# Altium PCB Portable_Guitar_MultiFX.PcbDoc
Units mil, origin at the board's own origin, x right, y up, seen from the top; angles counter-clockwise.
Board outline 1525 x 3675 mil, 2 copper layers (Top Layer, Bottom Layer), stack 62.249 mil thick; 67 components, 41 nets, 234 pads, 165 vias.
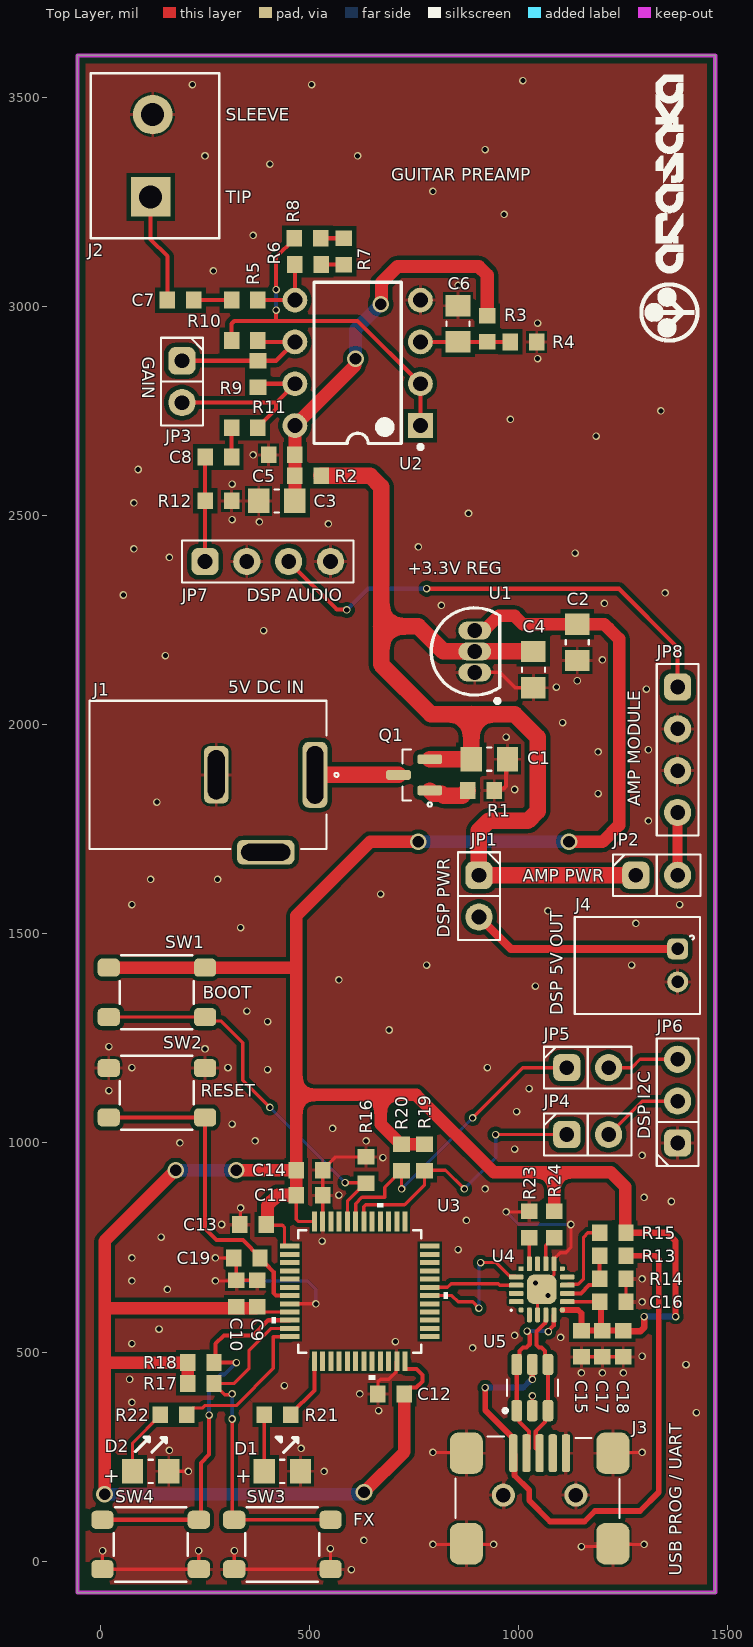
[diagram p0: Top Layer view]
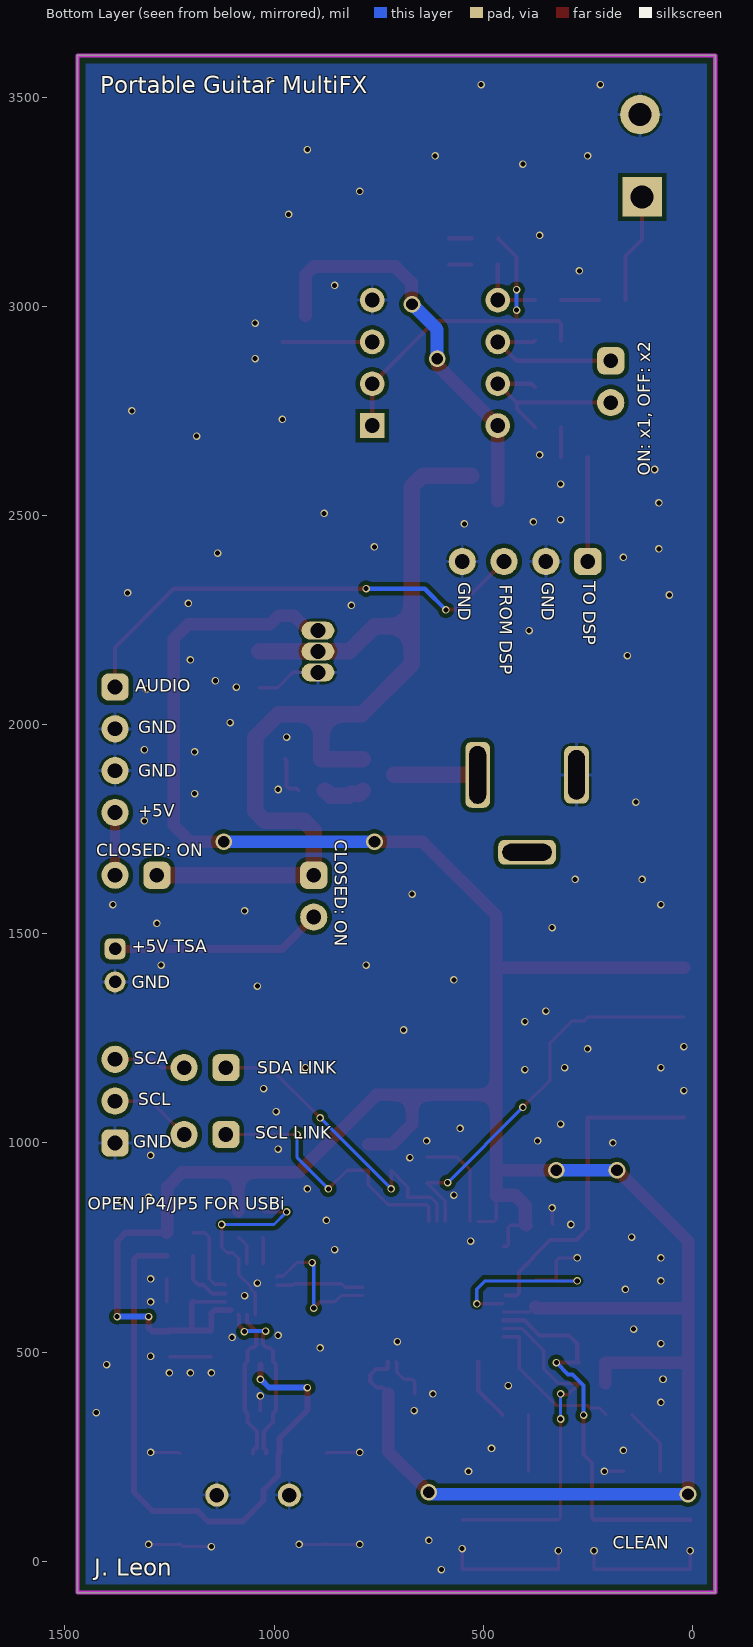
[diagram p1: Bottom Layer view, seen from below]
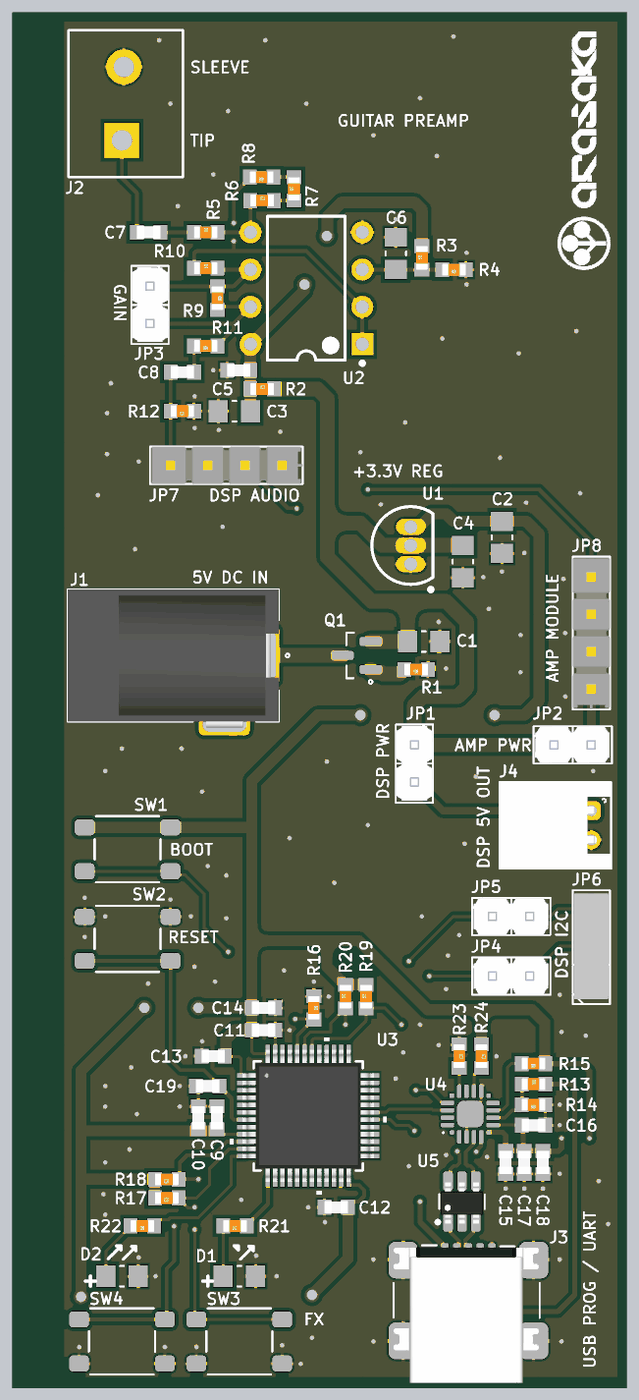
[diagram p2: 3D render of the assembled board from above, using the file's embedded part models]

## Layer stack, top to bottom
Top Solder: solder mask 0.4, Solder Resist, Dk 3.5
Top Layer: signal copper 1.4
Dielectric 1: dielectric 59.4488, FR-4, Dk 4.8
Bottom Layer: signal copper 1.4
Bottom Solder: solder mask 0.4, Solder Resist, Dk 3.5

## Board outline
-55,868.75 -55,3600 1470,3600 1470,-75 -55,-75

## Design rules (kind name [scope] priority, off if disabled: settings)
BoardOutlineClearance [All] p1: gap=20 ignorepadtopadclearanceinfootprint=FALSE
Clearance Clearance_u1 [IsPad And InComponent('U1')] p1: gap=6 ignorepadtopadclearanceinfootprint=FALSE
Clearance Clearance_u4 [IsPad And InComponent('U4')] p2: gap=6 ignorepadtopadclearanceinfootprint=TRUE
Clearance Clearance_u3 [IsPad And InComponent('U3')] p3: gap=6 ignorepadtopadclearanceinfootprint=TRUE
Clearance "Clearence vias" [IsVia] p4 off: gap=8 ignorepadtopadclearanceinfootprint=TRUE
Clearance "Same Differential Pair" [InNet('USB_DP') or InNet('USB_DM') vs InNet('USB_DP') Or InNet('USB_DM')] p5: gap=6 ignorepadtopadclearanceinfootprint=FALSE
Clearance [All] p6: gap=10 ignorepadtopadclearanceinfootprint=TRUE
DiffPairsRouting [All] p1: maxlimit=6 minlimit=6 mostfreqgap=6 toplayer_minwidth=10 toplayer_maxwidth=28 toplayer_prefwidth=28 bottomlayer_minwidth=10 bottomlayer_maxwidth=28 bottomlayer_prefwidth=28 maxuncoupledlength=500
HoleSize HoleSize_J1_Ranuras [IsPad And InComponent('J1')] p1: absolutevalues=TRUE maxlimit=137.8 minlimit=1 maxpercent=80.000 minpercent=20.000
HoleSize [All] p2: absolutevalues=TRUE maxlimit=200 minlimit=12 maxpercent=80.000 minpercent=20.000
HoleToHoleClearance [All] p1: gap=12 allowstackedmicrovias=TRUE
MinimumAnnularRing [All] p1: minimumring=3
MinimumSolderMaskSliver [All] p1: minsoldermaskwidth=3.94
PolygonConnect PolygonConnect_1 [InNet('GND')] p1: thpad.connectstyle=Relief thpad.reliefconductorwidth=8 thpad.reliefentries=4 thpad.polygonreliefangle="90 Angle" thpad.airgapwidth=6 smdpad.connectstyle=Relief smdpad.reliefconductorwidth=8 smdpad.reliefentries=4 smdpad.polygonreliefangle="90 Angle" smdpad.airgapwidth=6 via.connectstyle=Direct via.reliefconductorwidth=10 via.reliefentries=4 via.polygonreliefangle="90 Angle" via.airgapwidth=10
PolygonConnect [All] p2: connectstyle=Relief reliefconductorwidth=10 reliefentries=4 polygonreliefangle="90 Angle" airgapwidth=10
RoutingVias [All] p1: holewidth=12 width=22 viastyle="Through Hole" minholewidth=12 minwidth=18 maxholewidth=30 maxwidth=40
RoutingVias 5V [All] p2: holewidth=28 width=48 viastyle="Through Hole" minholewidth=28 minwidth=48 maxholewidth=28 maxwidth=48
RoutingVias "5V_A Via" [InNet('+5V_A')] p3: holewidth=11.81 width=23.62 viastyle="Through Hole" minholewidth=11.81 minwidth=23.62 maxholewidth=11.81 maxwidth=23.62
SilkToSilkClearance [All] p1: silktosilkclearance=2
SilkToSolderMaskClearance [IsPad] p1: minsilkscreentomaskgap=0.1 clearancetoexposedcopper=TRUE
SolderMaskExpansion SolderMaskExpansion_vias [IsVia] p1: expansion=2 istentingtop=TRUE
SolderMaskExpansion [All] p2: expansion=2 istentingtop=FALSE
SupplyNets "Schematic Supply Nets_6" [InNet('+5V_A')] p1: voltage=0.000
SupplyNets "Schematic Supply Nets_5" [InNet('GND')] p2: voltage=0.000
SupplyNets "Schematic Supply Nets_4" [InNet('VIN_5V_RAW')] p3: voltage=0.000
SupplyNets "Schematic Supply Nets_3" [InNet('+5V_SYS')] p4: voltage=0.000
SupplyNets "Schematic Supply Nets_2" [InNet('+5V_AMP')] p5: voltage=0.000
SupplyNets "Schematic Supply Nets_1" [InNet('+3V3_CTRL')] p6: voltage=0.000
SupplyNets "Schematic Supply Nets" [InNet('+5V_TSA')] p7: voltage=0.000
Width W_CONTROL_Y_ANALOGICA [InNet('+3V3_CTRL') OR InNet('+5V_A')] p1: maxlimit=31.5 minlimit=7.87 preferedwidth=13.78
Width W_5V_TSA [InNet('+5V_TSA')] p2: maxlimit=39.37 minlimit=11.81 preferedwidth=19.68
Width W_5V_ENTRADA [InNet('VIN_5V_RAW') OR InNet('+5V_SYS')] p3: maxlimit=78.74 minlimit=23.62 preferedwidth=39.37
Width W_5V_AMP [InNet('+5V_AMP')] p4: maxlimit=78.74 minlimit=23.62 preferedwidth=39.37
Width W_GENERAL [All] p5: maxlimit=39.37 minlimit=7.87 preferedwidth=9.84
24 further rules are at their usual default settings.

## Classes and differential pairs
component class U_04_Interfaces_Audio: J4 JP6 JP7 JP8
component class U_03_Control: C9 C10 C11 C12 C13 C14 C15 C16 C17 C18 C19 D1 D2 J3 JP4 JP5 R13 R14 R15 R16 R17 R18 R19 R20 R21 R22 R23 R24 SW1 SW2 SW3 SW4 U3 U4 U5
component class U_02_Entrada_Guitarra: C5 C6 C7 C8 J2 JP3 R3 R4 R5 R6 R7 R8 R9 R10 R11 R12 U2
component class U_01_Alimentacion: C1 C2 C3 C4 J1 JP1 JP2 Q1 R1 R2 U1
differential pair USB: +USB_DP -USB_DM

## Components (designator, comment, footprint, x,y, rotation, side; value= is the part's Value field where it differs from the comment)
C1 "10uF 25V" 0805_cap 930,1917.4 r0 top value=10uF
C2 "10uF 25V" 0805_cap 1140,2196.69 r90 top value=10uF
C3 "22uF 16V" 0805_cap 421.69,2535 r180 top value=22uF
C4 "10uF 25V" 0805_cap 1035,2131.69 r90 top value=10uF
C5 "0.1uF 50V" 0603_cap 433.5,2645 r180 top value=0.1uF
C6 "10uF 25V" 0805_cap 855,2958.31 r90 top value=10uF
C7 "470nF 50V" 0603_cap 191.5,3015 r0 top value=470nF
C8 "1uF 50V" 0603_cap 282,2640 r180 top value=1uF
C9 "1uF 50V" 0603_cap 375,640 r90 top value=1uF
C10 "0.1uF 50V" 0603_cap 325,640 r90 top value=0.1uF
C11 "0.1uF 50V" 0603_cap 500,875 r0 top value=0.1uF
C12 "0.1uF 50V" 0603_cap 695,400 r0 top value=0.1uF
C13 "0.1uF 50V" 0603_cap 365,805 r0 top value=0.1uF
C14 "10uF 10V" 0603_cap 500,935 r0 top value=10uF
C15 "10uF 10V" 0603_cap 1150,520 r270 top value=10uF
C16 "0.1uF 50V" 0603_cap 1225,620 r0 top value=0.1uF
C17 "10uF 10V" 0603_cap 1200,520 r270 top value=10uF
C18 "0.1uF 50V" 0603_cap 1250,520 r270 top value=0.1uF
C19 "0.1uF 50V" 0603_cap 350,725 r180 top value=0.1uF
D1 "2V" 0805_LED 435,215 r0 top
D2 "2.9V" 0805_LED 120,215 r0 top
J1 "PWR JACK 2.1mm" CON_POWER_BARREL_2.1MM_3CONN 395,1880 r270 top
J2 "Connector 2pos" CON_2x1_TH_5MM 130,3360 r90 top
J3 "USB Mini B" CON_5x1_SMD_miniUSB_B 1050,150 r0 top
J4 "TSA1701 - 5V A MICRO-US" CON_2x1_TH_2MM 1380,1424.37 r270 top
JP1 "2x1" H_2x1_TH_100mil 905,1590 r270 top
JP2 "2x1" H_2x1_TH_100mil 1330,1640 r0 top
JP3 "2x1" H_2x1_TH_100mil 195,2820 r270 top
JP4 "2x1" H_2x1_TH_100mil 1165,1020 r0 top
JP5 "2x1" H_2x1_TH_100mil 1165,1180 r0 top
JP6 "TSA1701 - CONTROL I2C" H_3X1_TH_100mil 1380,1100 r90 top
JP7 "TSA1701 - AUDIO ADC0/DAC0" H_4x1_TH_2.54mm 400,2390 r0 top
JP8 "PAM8302 - AUDIO Y ALIMENTACION" H_4x1_TH_2.54mm 1380,1940 r270 top
Q1 "P CH" SOT_23_3 750,1880 r180 top
R1 "10k 1/10W" 0603_res 910,1842.6 r180 top value=10k
R2 "100R 1/10W" 0603_res 496.5,2595 r0 top value=100R
R3 "10k 1/10W" 0603_res 925,2946.5 r90 top value=10k
R4 "10k 1/10W" 0603_res 1011.5,2915 r180 top value=10k
R5 "4k7 1/10W" 0603_res 345,3015 r0 top value=4k7
R6 "390k 1/10W" 0603_res 496.5,3100 r0 top value=390k
R7 "390k 1/10W" 0603_res 581.5,3131.5 r90 top value=390k
R8 "226k 1/10W" 0603_res 495,3163 r180 top value=226k
R9 "10k 1/10W" 0603_res 376.5,2838.5 r270 top value=10k
R10 "10k 1/10W" 0603_res 345,2918.5 r0 top value=10k
R11 "100R 1/10W" 0603_res 345,2710 r180 top value=100R
R12 "226k 1/10W" 0603_res 282,2535 r180 top value=226k
R13 "33k2 1/10W" 0603_res 1225,730 r0 top value=33k2
R14 "73k2 1/10W" 0603_res 1225,675 r180 top value=73k2
R15 "1k 1/10W" 0603_res 1225,785 r180 top value=1k
R16 "10k 1/10W" 0603_res 635,935 r270 top value=10k
R17 "10k 1/10W" 0603_res 240,425 r180 top value=10k
R18 "10k 1/10W" 0603_res 240,475 r180 top value=10k
R19 "4k7 1/10W" 0603_res 775,965 r90 top value=4k7
R20 "4k7 1/10W" 0603_res 720,965 r90 top value=4k7
R21 "1k 1/10W" 0603_res 423.19,350 r180 top value=1k
R22 "1k 1/10W" 0603_res 175,350 r180 top value=1k
R23 "10k 1/10W" 0603_res 1025,805 r270 top value=10k
R24 "10k 1/10W" 0603_res 1085,805 r270 top value=10k
SW1 "Sw" Sw_PUSH_4.5x4.5x5mm 135,1360 r0 top
SW2 "Sw" Sw_PUSH_4.5x4.5x5mm 135,1120 r0 top
SW3 "Sw" Sw_PUSH_4.5x4.5x5mm 435,40 r0 top
SW4 "Sw" Sw_PUSH_4.5x4.5x5mm 120,40 r0 top
U1 "MCP1700-3302E/TO" TO-92-TO3 895,2175 r0 top
U2 "MCP6002-I/P" PDIP300-P8 615,2865 r180 top
U3 "STM32F030C8T6TR" LQFP48_7x7mm 620,645 r0 top
U4 "CP2102N-A02-GQFN20R" WFQFN_20_EP_3X3MM 1055,650 r90 top
U5 "USBLC6-2SC6" SOT_23_6 1032.6,415.12 r90 top

## Footprints (in the part's own frame and the unit in brackets; to place one, negate y for a bottom-side part, rotate by r counter-clockwise, add the part's x,y. Pads: shape width x height; smd on the part's side, far side on the other; paste and mask are expansions set on the pad)
0603_cap [mil]
  rect 37x40 smd: 1(-31.5,0) 2(31.5,0)
  body extent -31,-17 31,17, height 34
0603_res [mil] "1608 Metric / 20190225 / C-A.Serna.A"
  rect 37x40 smd: 1(-31.5,0) 2(31.5,0)
  body extent -31,-16 32,16, height 12
0805_cap [mm]
  rect 1.3x1.5 smd: 1(-1.1,0) 2(1.1,0)
  silkscreen extent -0.13,-0.7 0.13,0.7, body extent -1.13,-0.7 1.07,0.7, height 1
0805_LED [mm]
  rect 1.3x1.5 smd: 1(-1.1,0) 2(1.1,0)
  silkscreen extent -0.36,-0.7 0.95,2.07, body extent -1,-0.62 1,0.63, height 1.1
CON_2x1_TH_2MM [mil] "/20190307/N-A.Potosi"
  rrect50% 50x50 hole 30: 1(-39.37,0)
  round 50 hole 30: 2(39.37,0)
  silkscreen extent -116,-246 116,53, body extent -117,-247 116,52, height 189
CON_2x1_TH_5MM [mm]
  rect 2.4x2.4 hole 1.4: 1(-2.5,0.254)
  round 2.4 hole 1.4: 2(2.5,0.127)
  silkscreen extent -5,-3.9 5,3.9, body extent -5,-3.9 5,3.9, height 10.2
CON_5x1_SMD_miniUSB_B [mm]
  rrect50% 2x2.5 smd: 0(-4.45,-2.75) 0(-4.45,2.75) 0(4.45,-2.75) 0(4.45,2.75)
  round 1.4 hole 0.889: 0(-2.2,0.2) 0(2.2,0.2)
  rrect50% 0.5x2.3 smd: 1(-1.6,2.75) 2(-0.8,2.75) 3(0,2.75) 4(0.8,2.75) 5(1.6,2.75)
  silkscreen extent -5.11,-1.18 4.85,3.76, body extent -5.1,-5.6 4.8,3.65, height 4
CON_POWER_BARREL_2.1MM_3CONN [mm]
  rrect50% 4x1.5 hole 1.016 slot 3.5 at 0 deg: 1(0,3)
  rrect50% 3.5x1.5 hole 1.016 slot 3 at 0 deg: 2(0,-3)
  rrect50% 1.5x3.5 hole 1.016 slot 3 at 90 deg: 3(4.7,0)
  silkscreen extent -4.5,-10.7 4.5,4.43, body extent -4.5,-10.7 4.9,3.7, height 11
H_2x1_TH_100mil [mil]
  rrect50% 65x65 hole 35: 1(-50,0)
  round 65 hole 35: 2(50,0)
  silkscreen extent -105,-50 105,50, body extent -101,-49 99,49, height 339
H_3X1_TH_100mil [mil]
  rrect50% 65x65 hole 35: 1(-100,0)
  round 65 hole 35: 2(0,0) 3(100,0)
  silkscreen extent -155,-50 150,50, body extent -142,-46 142,46, height 320
H_4x1_TH_2.54mm [mil]
  rrect50% 65x65 hole 35: 1(-150,0)
  round 65 hole 35: 2(-50,0) 3(50,0) 4(150,0)
  silkscreen extent -205,-50 205,50, body extent -200,-50 205,50, height 420
LQFP48_7x7mm [mil]
  rect 47x12 smd paste+0 mask+1.8: 1(-167.32,108.27) 2(-167.32,88.58) 3(-167.32,68.9) 4(-167.32,49.21) 5(-167.32,29.53) 6(-167.32,9.84) 7(-167.32,-9.84) 8(-167.32,-29.53) 9(-167.32,-49.21) 10(-167.32,-68.9) 11(-167.32,-88.58) 12(-167.32,-108.27) 25(167.32,-108.27) 26(167.32,-88.58) 27(167.32,-68.9) 28(167.32,-49.21) 29(167.32,-29.53) 30(167.32,-9.84) 31(167.32,9.84) 32(167.32,29.53) 33(167.32,49.21) 34(167.32,68.9) 35(167.32,88.58) 36(167.32,108.27)
  rect 12x47 smd paste+0 mask+1.8: 13(-108.27,-167.32) 14(-88.58,-167.32) 15(-68.9,-167.32) 16(-49.21,-167.32) 17(-29.53,-167.32) 18(-9.84,-167.32) 19(9.84,-167.32) 20(29.53,-167.32) 21(49.21,-167.32) 22(68.9,-167.32) 23(88.58,-167.32) 24(108.27,-167.32) 37(108.27,167.32) 38(88.58,167.32) 39(68.9,167.32) 40(49.21,167.32) 41(29.53,167.32) 42(9.84,167.32) 43(-9.84,167.32) 44(-29.53,167.32) 45(-49.21,167.32) 46(-68.9,167.32) 47(-88.58,167.32) 48(-108.27,167.32)
  silkscreen extent -211,-211 211,211, body extent -177,-177 177,177, height 63
PDIP300-P8 [mm] "8-Pin Plastic Dual In-Line Package (PDIP)"
  rect 1.5x1.5 hole 0.9: 1(-3.81,3.81)
  round 1.5 hole 0.9: 2(-3.81,1.27) 3(-3.81,-1.27) 4(-3.81,-3.81) 5(3.81,-3.81) 6(3.81,-1.27) 7(3.81,1.27) 8(3.81,3.81)
  silkscreen extent -3.94,-4.9 2.65,5.23, body extent -3.55,-4.9 3.55,4.9, height 4.32
SOT_23_3 [mm]
  rrect50% 1.5x0.6 smd: 1(-0.95,0.95) 2(-0.95,-0.95) 3(0.95,0)
  silkscreen extent -1.07,-1.55 0.7,1.92, body extent -0.7,-1.52 0.7,1.53, height 1.12
SOT_23_6 [mm]
  rrect50% 1.3x0.65 smd: 1(-1.4,0.95) 2(-1.4,0) 3(-1.4,-0.95) 4(1.4,-0.95) 5(1.4,0) 6(1.4,0.95)
  silkscreen extent -1.52,-1.55 0.5,1.78, body extent -1.5,-1.45 1.3,1.45, height 1.45
Sw_PUSH_4.5x4.5x5mm [mm]
  rrect50% 1.35x1.1 smd: 1(-2.925,1.5) 1(2.925,1.5) 2(-2.925,-1.5) 2(2.925,-1.5)
  silkscreen extent -2.25,-2.25 2.25,2.25, body extent -2.25,-2.25 2.25,2.25, height 5
TO-92-TO3 [mm] "TO, Flat Index; 3 In-Line, Axial Leads; Body Dia. 4.8mm; Leads 0.56 x 0.53 mm (max)"
  oval 2x1.1 hole 0.9: 1(0,-1.27)
  oval 2x1.103 hole 0.9: 2(0,0) 3(0,1.27)
  silkscreen extent -2.65,-3.13 1.52,2.65, body extent -2.65,-2.66 1.52,2.66, height 5.33
WFQFN_20_EP_3X3MM [mm]
  rrect50% 0.3x0.3 smd: 1(-1.25,1.25) 6(-1.25,-1.25) 11(1.25,-1.25)
  rrect50% 0.9x0.3 smd: 2(-1.55,0.75) 3(-1.55,0.25) 4(-1.55,-0.25) 5(-1.55,-0.75) 12(1.55,-0.75) 13(1.55,-0.25) 14(1.55,0.25) 15(1.55,0.75)
  rrect50% 0.3x0.9 smd: 7(-0.75,-1.55) 8(-0.25,-1.55) 9(0.25,-1.55) 10(0.75,-1.55) 17(0.75,1.55) 18(0.25,1.55) 19(-0.25,1.55) 20(-0.75,1.55)
  rect 0.3x0.3 smd: 16(1.25,1.25)
  rrect50% 1.8x1.8 smd: 21(0,0)
  silkscreen extent -1.32,1.8 -1.22,1.9, body extent -1.5,-1.5 1.5,1.5, height 0.8

## Part data
C1 C2 C4 C6: library part Cap_10uF_0805_25V_, "25V 10uF X5R ±10% 0805 Multilayer Ceramic Capacitors MLCC - SMD/SMT ROHS", Manufacturer="Samsung Electro-Mechanics", Manufacturer Part Number=CL21A106KAYNNNE, Supplier Part Number 1=C15850, ComponentLink1Description=LCSC, ComponentLink1URL=https://lcsc.com/product-detail/Multilayer-Ceramic-Capacitors-MLCC-SMD-SMT_Samsung-Electro-Mechanics-CL21A106KAYNNNE_C15850.html, Supplier 1=LCSC
C3: library part Cap_22uF_0805_16V, "16V 22uF X5R ±20% 0805 Multilayer Ceramic Capacitors MLCC - SMD/SMT ROHS", Manufacturer=Chinocera, Manufacturer Part Number=HGC0805R5226M160NSLJ, Supplier Part Number 1=C33546008, ComponentLink1Description=LCSC, ComponentLink1URL=https://lcsc.com/product-detail/Multilayer-Ceramic-Capacitors-MLCC-SMD-SMT_Chinocera-HGC0805R5226M160NSLJ_C33546008.html, Supplier 1=LCSC
C5 C10 C11 C12 C13 C16 C18 C19: library part Cap_0.1uF_0603_50V, "50V 100nF Y5V -20%~+80% 0603 Multilayer Ceramic Capacitors MLCC - SMD/SMT ROHS", Manufacturer="Walsin Tech Corp", Manufacturer Part Number=0603F104Z500CT, Supplier Part Number 1=C83060, ComponentLink1Description=LCSC, ComponentLink1URL=https://www.lcsc.com/product-detail/Multilayer-Ceramic-Capacitors-MLCC-SMD-SMT_Walsin-Tech-Corp-0603F104Z500CT_C83060.html, Supplier 1=LCSC
C7: library part Cap_470nF_0603_50V, "50V 470nF X7R ±10% 0603 Multilayer Ceramic Capacitors MLCC - SMD/SMT ROHS", Manufacturer=Chinocera, Manufacturer Part Number=HGC0603R7474K500NTHJ, Supplier Part Number 1=C33546006, ComponentLink1Description=LCSC, ComponentLink1URL=https://lcsc.com/product-detail/Multilayer-Ceramic-Capacitors-MLCC-SMD-SMT_Chinocera-HGC0603R7474K500NTHJ_C33546006.html, Supplier 1=LCSC
C8 C9: library part Cap_1uF_0603_50V, "50V 1uF X5R ±10% 0603 Multilayer Ceramic Capacitors MLCC - SMD/SMT ROHS", Manufacturer="Samsung Electro-Mechanics", Manufacturer Part Number=CL10A105KB8NNNC, Supplier Part Number 1=C15849, ComponentLink1Description=LCSC, ComponentLink1URL=https://www.lcsc.com/product-detail/Multilayer-Ceramic-Capacitors-MLCC-SMD-SMT_Samsung-Electro-Mechanics-CL10A105KB8NNNC_C15849.html, Supplier 1=LCSC
C14 C15 C17: library part Cap_10uF_0603_10V, "10V 10uF X5R ±10% 0603 Multilayer Ceramic Capacitors MLCC - SMD/SMT ROHS", Manufacturer=CCTC, Manufacturer Part Number=TCC0603X5R106K100CT, Supplier Part Number 1=C380314, ComponentLink1Description=LCSC, ComponentLink1URL=https://www.lcsc.com/product-detail/Multilayer-Ceramic-Capacitors-MLCC-SMD-SMT_CCTC-TCC0603X5R106K100CT_C380314.html, Supplier 1=LCSC
D1: library part LED_0805_RED, "LED RED CLEAR 0805 SMD", Manufacturer=XINGLIGHT, Manufacturer Part Number=XL-2012SURC, Supplier Part Number 1=C965812, ComponentLink1Description=LCSC, ComponentLink1URL=https://www.lcsc.com/product-detail/Light-Emitting-Diodes-LED_XINGLIGHT-XL-2012SURC_C965812.html, Supplier 1=LCSC
D2: library part LED_0805_Green, "LED GREEN CLEAR 0805 SMD", Manufacturer=XINGLIGHT, Manufacturer Part Number=XL-2012UGC, Supplier Part Number 1=C965815, ComponentLink1Description=LCSC, ComponentLink1URL=https://www.lcsc.com/product-detail/Light-Emitting-Diodes-LED_XINGLIGHT-XL-2012UGC_C965815.html, Supplier 1=LCSC
J1: library part Con_Power_Jack_2.1mm_3pins, "CONN PWR JACK 2X5.5MM SOLDER", Manufacturer=HCTL, Manufacturer Part Number=HC-DC-005-2.0T, Supplier Part Number 1=C3010533, ComponentLink1Description=LCSC, ComponentLink1URL=https://www.lcsc.com/product-detail/AC-DC-Power-Connectors_HCTL-HC-DC-005-2-0T_C3010533.html, Supplier 1=LCSC
J2: library part Con_2x1_TH_5mm, "2POS 5MM", Manufacturer=JILN, Manufacturer Part Number=JL126-50002G01, Supplier Part Number 1=C394556, ComponentLink1Description=Digi-Key, ComponentLink1URL=https://www.lcsc.com/product-detail/Screw-terminal_JILN-JL126-50002G01_C394556.html, Supplier 1=LCSC
J3: library part Con_Mini_USB_B, "CONN RCPT USB2.0 MINI B SMD R/A", Manufacturer="EDAC Inc.", Manufacturer Part Number=KH-MINI-SMT-5P-Cu, Supplier Part Number 1=C2688795, ComponentLink1Description=LCSC, ComponentLink1URL=https://datasheet.lcsc.com/lcsc/2106070035_Shenzhen-Kinghelm-Elec-KH-MINI-SMT-5P-Cu_C2688795.pdf, Supplier 1=LCSC
J4: library part Con_2x1_TH_JST_2MM, "2POS 2MM", Manufacturer=JST, Manufacturer Part Number=S2B-PH-K-S(LF)(SN), Supplier Part Number 1=C173752, ComponentLink1Description=Digi-Key, ComponentLink1URL=https://lcsc.com/product-detail/Wire-To-Board-Connector_JST-S2B-PH-K-S-LF-SN_C173752.html, Supplier 1=LCSC
JP1 JP2 JP3 JP4 JP5: library part H_Male_2x1_TH_100mil, "H_Male_2x1_TH_100mil", ComponentLink1Description=LCSC
JP6: library part H_Male_3x1_TH_100mil, "H_Male_3x1_TH_100mil", ComponentLink1Description=LCSC
JP7 JP8: library part H_Male_4x1_TH_100mil, "H_Male_4x1_TH_100mil", ComponentLink1Description=LCSC
Q1: library part Q_PFET_30V_3A_SOT23, "MOSFET P-CH 20V 3A SOT23", Manufacturer="ALLPOWER(ShenZhen Quan Li Semiconductor)", Manufacturer Part Number=AP2301, Supplier Part Number 1=C385296, ComponentLink1Description=LCSC, ComponentLink1URL=https://www.lcsc.com/product-detail/MOSFETs_ALLPOWER-ShenZhen-Quan-Li-Semiconductor-AP2301_C385296.html, Supplier 1=LCSC
R1 R3 R4 R9 R10 R16 R17 R18 R23 R24: library part Res_10k_0603_1/10W, "RES SMD 10k OHM 5% 1/10W 0603", Manufacturer=FOJAN, Manufacturer Part Number=FRC0603J103TS, Supplier Part Number 1=C2930027, ComponentLink1Description=LCSC, ComponentLink1URL=https://www.lcsc.com/product-detail/Chip-Resistor-Surface-Mount_FOJAN-FRC0603J103TS_C2930027.html, Supplier 1=LCSC
R2 R11: library part Res_100R_0603_1/10W, "RES SMD 100R OHM 5% 1/10W 0603", Manufacturer=FOJAN, Manufacturer Part Number="FRC0603J101 TS", Supplier Part Number 1=C2907089, ComponentLink1Description=LCSC, ComponentLink1URL=https://www.lcsc.com/product-detail/Chip-Resistor-Surface-Mount_FOJAN-FRC0603J101-TS_C2907089.html, Supplier 1=LCSC
R5 R19 R20: library part Res_4k7_0603_1/10W, "100mW Thick Film Resistor 75V ±1% 4.7kΩ 0603 Chip Resistor - Surface Mount ROHS", Manufacturer=VO, Manufacturer Part Number=SCR0603F4K7, Supplier Part Number 1=C3016318, ComponentLink1Description=LCSC, ComponentLink1URL=https://lcsc.com/product-detail/Chip-Resistor-Surface-Mount_VO-SCR0603F4K7_C3016318.html, Supplier 1=LCSC
R6 R7: library part Res_390k_0603_1/10W, "100mW Thick Film Resistor 75V ±100ppm/℃ ±1% 390kΩ 0603 Chip Resistor - Surface Mount ROHS", Manufacturer=YAGEO, Manufacturer Part Number=RC0603FR-07390KL, Supplier Part Number 1=C137735, ComponentLink1Description=LCSC, ComponentLink1URL=https://lcsc.com/product-detail/Chip-Resistor-Surface-Mount_YAGEO-RC0603FR-07390KL_C137735.html, Supplier 1=LCSC
R8 R12: library part Res_226k_0603_1/10W, "100mW Thick Film Resistors 75V ±100ppm/℃ ±1% 226kΩ 0603 Chip Resistor - Surface Mount ROHS", Manufacturer=YAGEO, Manufacturer Part Number=RC0603FR-07226KL, Supplier Part Number 1=C165744, ComponentLink1Description=LCSC, ComponentLink1URL=https://lcsc.com/product-detail/Chip-Resistor-Surface-Mount_YAGEO-RC0603FR-07226KL_C165744.html, Supplier 1=LCSC
R13: library part Res_33k2_0603_1/10W, "100mW Thick Film Resistor 75V ±100ppm/℃ ±1% 33.2kΩ 0603 Chip Resistor - Surface Mount ROHS", Manufacturer=YAGEO, Manufacturer Part Number=RC0603FR-0733K2L, Supplier Part Number 1=C185338, ComponentLink1Description=LCSC, ComponentLink1URL=https://lcsc.com/product-detail/Chip-Resistor-Surface-Mount_YAGEO-RC0603FR-0733K2L_C185338.html, Supplier 1=LCSC
R14: library part Res_73k2_0603_1/10W, "100mW Thick Film Resistor 75V ±100ppm/℃ ±1% 73.2kΩ 0603 Chip Resistor - Surface Mount ROHS", Manufacturer=YAGEO, Manufacturer Part Number=RC0603FR-0773K2L, Supplier Part Number 1=C163420, ComponentLink1Description=LCSC, ComponentLink1URL=https://lcsc.com/product-detail/Chip-Resistor-Surface-Mount_YAGEO-RC0603FR-0773K2L_C163420.html, Supplier 1=LCSC
R15 R21 R22: library part Res_1k_0603_1/10W, "RES SMD 1k OHM 5% 1/10W 0603", Manufacturer=FOJAN, Manufacturer Part Number="FRC0603J102 TS", Supplier Part Number 1=C2907113, ComponentLink1Description=LCSC, ComponentLink1URL=https://www.lcsc.com/product-detail/Chip-Resistor-Surface-Mount_FOJAN-FRC0603J102-TS_C2907113.html, Supplier 1=LCSC
SW1 SW2 SW3 SW4: library part Sw_PUSH_4.5x4.5x5.0xmm, "SWITCH TACTILE SPST-NO 0.05A 12V", Manufacturer=BZCN, Manufacturer Part Number=TSC015A05026A, Supplier Part Number 1=C2888509, ComponentLink1Description=LCSC, ComponentLink1URL=https://www.lcsc.com/product-detail/Tactile-Switches_BZCN-TSC015A05026A_C2888509.html, Last modified by=N-A.Potosi, Last modified date=20190222, Supplier 1=LCSC
U1: library part CMP-0136-00007-1, "Low Quiescent Current LDO, 3-Pin TO-92, Extended TemperatureBAG", DatasheetVersion="revB, Feb-2007", PackageDescription="3-Lead Plastic Transistor Outline (TO) [TO-92]", PackageReference=TO-92-TO3, PackageVersion="revBB, Aug-2009"
U2: library part CMP-0187-00119-3, "None", Case/Package=PDIP, Input Bias Current=1pA, Input Offset Voltage (Vos)=4.5mV, Max Frequency=1kHz, Max Input Voltage=6V, Max Operating Temperature=85°C, Min Input Voltage=1.8V, Min Operating Temperature=-40°C, Nominal Supply Current=100uA, Operating Supply Voltage=5.5V, Output Current=23mA, Package Quantity=60, Power Supply Rejection Ratio (PSRR)=86dB, Voltage Gain=112dB, Amplifier Type="GENERAL PURPOSE", Bandwidth=1MHz, Common Mode Rejection Ratio=60dB, Gain Bandwidth Product=1MHz, Height=0.195inch, Input Offset Voltage-Max=4.5mV, Lead Free="Lead Free", Length=0.4inch, Max Supply Voltage=6V, Min Supply Voltage=1.8V, Mount="Through Hole", Number of Amplifiers=2, Number of Channels=2, Number of Circuits=2, Number of Elements=2, Number of Pins=8, Operating Supply Current=100uA, Output Current per Channel=23mA, Packaging=Rail/Tube, Radiation Hardening=No, REACH SVHC="No SVHC", RoHS Compliant=Yes, Slew Rate=0.6V/µs, Slew Rate-Nom=0.6V/µs, Supply Current=100uA, Technology=CMOS, Unity Gain Bandwidth Product=1MHz, Width=0.28inch
U3: library part IC_STM32F030C8T6TR_LQFP48_7x7MM, "IC MCU 32BIT 64KB FLASH 48LQFP", Manufacturer=STMicroelectronics, Supplier Part Number 1=C23922, ComponentLink1Description=LCSC, ComponentLink1URL=https://www.lcsc.com/product-detail/ST-Microelectronics_STMicroelectronics-STM32F030C8T6_C23922.html, Manufacturer Part Number=STM32F030C8T6TR, Supplier 1=LCSC
U4: library part IC_SGL_USB2UART-BRIDGE_20QFN, "IC USB TO UART BRIDGE QFN20", Manufacturer="Silicon Labs", Supplier Part Number 1=C969913, ComponentLink1Description=LCSC, ComponentLink1URL=https://www.lcsc.com/product-detail/USB-ICs_SILICON-LABS-CP2102N-A02-GQFN20R_C969913.html, Manufacturer Part Number=CP2102N-A02-GQFN20R, Supplier 1=LCSC
U5: library part TVS_5.25V_2CH_SOT_23_6, "TVS DIODE 5.25V 17V SOT23-6", Manufacturer=STMicroelectronics, Supplier Part Number 1=C7519, ComponentLink1Description=LCSC, ComponentLink1URL=https://www.lcsc.com/product-detail/ESD-Protection-Devices_STMicroelectronics-USBLC6-2SC6_C7519.html, Manufacturer Part Number=USBLC6-2SC6, Supplier 1=LCSC

## Via types
v1: diameter 18, hole 12, Top Layer to Bottom Layer, tented both sides, 157 vias
v2: diameter 40, hole 28, Top Layer to Bottom Layer, tented both sides, 8 vias

## Nets (pads, with @x,y where several pads share a name; then routed paths per layer and width w, separated by ;. In a path a pad name is that pad's centre, name@x,y a point inside that pad or via, vN(x,y) a via of type N, cw(c..) or ccw(c..) an arc to the next point about the centre after c; other vN are vias at no path point)
+3V3_CTRL: C2.2 C9.1 C10.1 C11.1 C12.2 C13.2 C14.1 C15.1 C16.1 C17.1 C18.1 R15.1 R17.2 R18.2 R19.2 R20.2 R24.1 SW1.1 U1.3 U3.1 U3.9 U3.24 U3.48 U4.6 U4.7 | length 8083.2
  Top Layer w7.87: C9.1 387.71,595.79 U3.9 ; C13.2@396.5,803.5 435.39,803.5 440,798.89 440,755.33 442.06,753.27 U3.1 ; C11.1 468.5,816.94 473.11,812.32 U3.48 ; U4.7 1116.18,620.32 1193.18,620.32 C16.1
  Top Layer w10: C12.2 726.5,401.5 740,415 755,415 770,430 770,445 755.82,459.18 729.27,459.18 728.27,460.18 U3.24
  Top Layer w13.78: U4.6 1141.93,600.79 1150,592.72 C15.1 C17.1 ; C16.1 1196.75,616.75 1196.75,554.75 C17.1 ; C18.1 C17.1
  Top Layer w15: C18.1 1251.5,550 1291.21,550 1300,558.79 v1(1300,585) ; R15.1 1355,785 1375,765 v1(1375,585)
  Top Layer w30: v2(10,160) 10,475 ; SW1.1@19.84,1419.06 250.16,1419.06 468.5,1419.06 ; v2(180,935) 10,765 10,605 ; R17.2 R18.2 10,475 ; v2(325,935) C14.1 ; C9.1 371.5,605 10,605 ; C11.1@468.5,875.28 C14.1 ; v2(630,165) 726.5,261.5 C12.2 ; v2(760,1720) 645,1720 468.5,1543.5 468.5,1419.06 ; R19.2 R20.2 718.5,996.5 670,1045 670,1115 ; U1.3 917.22,2225 952.22,2260 990,2260 1010,2240 C2.2 1205,2240 1214.99,2230.01 1240,2205 1240,1760 1200,1720 v2(1120.13,1720) ; R24.1 1085,930 ; R15.1 1255,786.5 1255,895 1220,930 1085,930 ; 10,475 10,605 ; C14.1 468.5,1115 ; 468.5,1115 468.5,1419.06 ; 468.5,1115 670,1115 ; 670,1115 755,1115 940,930 1085,930
  Top Layer w31.5: C13.2@396.5,803.5 399.25,806.25 399.25,850.8 423.45,875 C11.1
  Bottom Layer w15: v1(1300,585) v1(1375,585)
  Bottom Layer w30: v2(10,160) 622.29,160 627.29,165 v2(630,165) ; v2(180,935) v2(325,935) ; v2(760,1720) v2(1120.13,1720)
+5V_A: C3.1 C5.1 R2.1 R3.2 U2.8 | length 981.8
  Top Layer w31.5: C3.1 R2.1 C5.1 U2.8 608.37,2858.37 608.37,2873.37 v2(610,2875) ; v2(670,3005) 671.63,3006.63 671.63,3056.63 710,3095 905,3095 925,3075 R3.2
  Bottom Layer w31.5: v2(610,2875) 610,2945 v2(670,3005)
+5V_AMP: JP2.2 JP8.4 | length 150
  Top Layer w23.62: JP2.2 JP8.4
+5V_SYS: C1.1 C4.2 JP1.1 JP2.1 Q1.2 R2.2 U1.2 | length 2438.8
  Top Layer w39.37: R2.2 645,2595 671.06,2568.94 671.06,2235 ; Q1.2 C1.1 886.69,2025 ; U1.2 820,2175 760,2235 671.06,2235 ; U1.2@895,2175.63 1034.37,2175.63 C4.2 ; JP2.1 JP1.1 905,1746.94 928.06,1770 1021.94,1770 1045,1793.06 1045,1970 990,2025 886.69,2025 ; 671.06,2235 671.06,2143.94 790,2025 886.69,2025
+5V_TSA: J4.1 JP1.2 | length 506.6
  Top Layer w19.68: JP1.2 981.26,1463.74 J4.1
BOOT: R16.2 SW1.2 U3.44 | length 943
  Top Layer w7.87: SW1.2@19.84,1300.94 250.16,1300.94 259.65,1291.46 288.54,1291.46 340,1240 340,1150 v1(405,1085) ; v1(585,905) 633.5,905 R16.2 633.5,903.5 590.47,860.47 U3.44
  Bottom Layer w7.87: v1(405,1085) v1(585,905)
BTN_CLEAN: R18.1 SW4.1 U3.10 | length 950.2
  Top Layer w9.84: SW4.1@4.84,99.06 235.16,99.06 240,103.9 240,235 260,255 v1(260,349.13) ; v1(325,475) 275,475 R18.1 275,478.5 275,520 295,540 365,540 401.1,576.1 U3.10
  Bottom Layer w9.84: v1(260,349.13) 260,420 286.72,446.72 296.72,446.72 v1(325,475)
BTN_FX: R17.1 SW3.1 U3.11 | length 850.8
  Top Layer w7.87: v1(315,340) 315,103.9 319.84,99.06 SW3.1@550.16,99.06 ; v1(315,400) 312.26,400 310.06,397.8 297.2,397.8 271.5,423.5 R17.1 320,425 355,460 355,503.33 408.09,556.42 U3.11
  Bottom Layer w7.87: v1(315,340) v1(315,400)
DSP_LINE_OUT: JP7.3 JP8.1 | length 1152
  Top Layer w9.84: JP7.3 565.13,2274.87 588.26,2274.87 v1(588.89,2274.24) ; v1(780,2325) 1240,2325 1380,2185 JP8.1
  Bottom Layer w9.84: v1(588.89,2274.24) 639.66,2325 v1(780,2325)
GND: C1.2 C2.1 C3.2 C4.1 C5.2 C6.2 C9.2 C10.2 C11.2 C12.1 C13.1 C14.2 C15.2 C16.2 C17.2 C18.2 C19.2 D1.2 D2.2 J1.2 J2.2 J3.0 J3.5 J4.2 JP6.1 JP7.2 JP7.4 JP8.2 JP8.3 R1.1 R4.1 R12.1 R14.1 R16.1 R23.1 SW2.1 SW3.2 SW4.2 U1.1 U2.4 U3.8 U3.23 U3.47 U4.3 U4.12 U4.21 U5.2 | length 2998.5
  Top Layer w7.87: v1(5,25) 5,-18.9 4.84,-19.06 235.16,-19.06 235,-18.9 v1(235,25) ; D2.2 v1(210,215) ; v1(275,670) 323.5,670 C10.2 ; v1(275,725) C19.2 325,718.5 C10.2 ; v1(320,25) 320,-18.9 319.84,-19.06 550.16,-19.06 550,-18.9 v1(550,30) ; C13.1 335,806.5 v1(335,845) ; C9.2 C10.2 ; U3.8 452.91,615.24 514.76,615.24 v1(515,615) ; U3.47 531.42,934.92 C14.2 531.5,936.5 546.06,951.06 547.56,951.06 563,966.5 R16.1 ; C12.1 663.5,428.5 670,435 689.77,435 706.52,451.75 706.52,475.61 U3.23 ; v1(795,40) 873.07,40 874.8,41.73 876.54,40 v1(940,40) ; v1(795,260) 873.07,260 J3.0@874.8,258.27 ; U1.1 955,2125 991.61,2088.39 C4.1 ; v1(970,835) 1023.5,835 R23.1 ; U5.2 v1(1032.6,395.43) ; U4.3 1045.16,640.16 U4.21 1055,655.69 1084.37,685.06 1084.37,710.87 U4.12 1084.53,722.83 1099.09,737.4 1112.4,737.4 1125,750 v1(1125,805) ; v1(1150,35) 1218.46,35 1225.2,41.73 1226.93,40 v1(1300,40) ; C15.2 C18.2 ; J3.0@1225.2,258.27 1226.93,260 v1(1295,260) ; C16.2 R14.1
  Top Layer w9.84: R1.1 946.5,1847.6 964.23,1847.6 970,1853.36 970,1914.1 C1.2
  Bottom Layer w7.87: v1(275,670) 495,670 515,650 v1(515,615) ; v1(970,835) 1000,805 v1(1125,805)
  other v1: 600,-20 630,50 535,215 165,265 480,270 1425,355 665,360 75,380 620,400 440,420 70,435 1150,450 1200,450 1250,450 1400,470 1295,490 890,510 75,520 705,525 1100,535 990,540 140,555 1295,620 1070,635 160,650 1040,665 75,670 1295,675 75,725 855,745 530,765 145,775 290,805 875,815 1365,860 1300,870 570,875 920,890 675,965 1295,970 990,985 190,1000 370,1005 635,1005 555,1035 315,1045 995,1075 20,1125 1025,1130 400,1175 75,1180 305,1180 925,1180 250,1225 20,1230 690,1270 400,1290 350,1315 1040,1375 570,1390 780,1425 1270,1425 335,1515 1280,1525 1070,1555 75,1570 1385,1570 670,1595 120,1630 280,1630 1310,1770 135,1815 1190,1835 990,1845 1190,1935 1310,1940 970,1970 1105,2005 1305,2085 1090,2090 1140,2105 1200,2155 155,2165 390,2225 815,2285 1205,2290 55,2310 1350,2315 165,2400 1135,2410 80,2420 760,2425 545,2480 380,2485 315,2490 880,2505 80,2530 315,2575 90,2610 365,2645 1185,2690 980,2730 1340,2750 1045,2875 1045,2960 855,3050 270,3085 365,3170 965,3220 795,3275 405,3340 250,3360 615,3360 920,3375 220,3530 505,3530 1010,3540
GTR_BIASED: R5.2 R6.1 U2.5 | length 173.5
  Top Layer w9.84: R5.2 U2.5 R6.1
LED_CLEAN: R22.1 U3.12 | length 368.6
  Top Layer w7.87: R22.1 206.5,351.5 221.06,366.06 243.63,366.06 249.63,372.06 324.5,372.06 413.43,460.99 413.43,536.48 452.43,536.48 U3.12
LED_FX: R21.1 U3.13 | length 151.3
  Top Layer w9.84: R21.1 454.69,351.5 511.73,408.54 U3.13
MCU_SCL: JP4.1 R19.1 U3.42 | length 680.9
  Top Layer w7.87: U3.42 629.84,847.51 634.45,852.13 727.13,852.13 775,900 R19.1 776.5,935 825,935 v1(870,890) ; v1(945,1020) JP4.1
  Bottom Layer w7.87: v1(870,890) 945,965 v1(945,1020)
MCU_SDA: JP5.1 R20.1 U3.43 | length 758.2
  Top Layer w7.87: U3.43 610.16,854.88 625.28,870 680,870 680,893.5 703.94,917.44 703.94,918.94 718.5,933.5 R20.1 v1(720,890) ; v1(890,1060) 1010,1180 JP5.1
  Bottom Layer w7.87: v1(720,890) v1(890,1060)
NetC6_1: C6.1 R3.1 R4.2 U2.3 | length 215
  Top Layer w9.84: U2.3 R4.2
NetC7_1: C7.1 J2.1 | length 263.1
  Top Layer w9.84: J2.1 120,3160 160,3120 C7.1
NetC7_2: C7.2 R5.1 | length 90.5
  Top Layer w9.84: C7.2 R5.1
NetC8_1: C8.1 R11.2 | length 70
  Top Layer w9.84: C8.1 R11.2
NetC8_2: C8.2 JP7.1 R12.2 | length 250.2
  Top Layer w9.84: JP7.1 250,2639.5 C8.2
NetD1_1: D1.1 R21.2 | length 135
  Top Layer w7.87: D1.1 R21.2
NetD2_1: D2.1 R22.2 | length 162.7
  Top Layer w7.87: D2.1 76.69,281.69 143.5,348.5 R22.2
NetJP3_1: JP3.1 R9.1 R10.2 U2.6 | length 378.6
  Top Layer w9.84: JP3.1 R9.1 420,2870 U2.6 380,2915 R10.2
NetJP3_2: JP3.2 R9.2 R11.1 U2.7 | length 458.2
  Top Layer w9.84: JP3.2 419,2770 419.5,2769.5 ; R11.1 376.5,2711.5 419.5,2754.5 419.5,2769.5 ; R9.2 384.5,2815 U2.7 419.5,2769.5
NetJP4_2: JP4.2 JP6.2 | length 198.1
  Top Layer w7.87: JP4.2 1295,1100 JP6.2
NetJP5_2: JP5.2 JP6.3 | length 173.3
  Top Layer w7.87: JP5.2 1270,1180 1290,1200 JP6.3
NetQ1_1: Q1.1 R1.2 | length 101.5
  Top Layer w39.37: Q1.1 795.28,1834.72 816.45,1834.72 821.18,1830 865.03,1830 877.63,1842.6 R1.2
NetR6_2: R6.2 R7.1 | length 53.5
  Top Layer w9.84: R6.2 R7.1
NetR7_2: R7.2 R8.1 | length 55
  Top Layer w9.84: R8.1 R7.2
NetR15_2: R15.2 U4.9 | length 187.9
  Top Layer w7.87: U4.9 1117.99,661.81 1141.81,661.81 1155,675 1155,775 1165,785 R15.2
NetR23_2: R23.2 U4.15 | length 62.7
  Top Layer w7.87: R23.2 1025.47,773.03 U4.15
NetR24_2: R24.2 U4.13 | length 71.7
  Top Layer w7.87: U4.13 1064.84,754.84 1083.5,773.5 R24.2
RESET: C19.1 SW2.2 U3.7 | length 789.1
  Top Layer w9.84: SW2.2@19.84,1060.94 250.16,1060.94 250,1060.79 250,795 277.46,767.54 340.46,767.54 381.5,726.5 C19.1 ; C19.1@381.5,723.5 395.08,709.92 396.18,709.92 414.26,691.85 414.26,640.77 420.02,635 446.1,635 U3.7@446.26,635.16
STM_RX: U3.31 U4.18 | length 211.9
  Top Layer w7.87: U3.31 829.75,654.84 838.53,663.62 951.38,663.62 955,660 993.82,660 U4.18
STM_TX: U3.30 U4.17 | length 340.2
  Top Layer w7.87: U3.30 839.84,635.16 855,620 890,620 v1(905,605) ; v1(908.78,714) 946,714 978.5,681.5 992.01,681.5 U4.17
  Bottom Layer w7.87: v1(905,605) 905,707.48 908.78,711.26 v1(908.78,714)
USB_5V_PC: J3.1 R13.2 U5.5 | length 1468.2
  Top Layer w13.78: v1(920,415) 920,360.71 987.01,293.7 J3.1 989.96,255.32 989.96,205.04 1025,170 1025,145 1075,95 1157.5,95 1182.5,120 1290,120 1335,165 1335,721.93 1326.93,730 R13.2 ; v1(1032.6,434.8) U5.5
  Bottom Layer w13.78: v1(920,415) 1011.65,415 1031.46,434.8 v1(1032.6,434.8)
USB_DM: J3.2 U4.5 U5.1 U5.6 | length 424.6
  Top Layer w10: J3.2 1018.5,265.16 1023.35,270 1024.6,270 1024.6,310 1002.13,332.47 1002.13,353.07 U5.1 U5.6 1002.13,477.17 1002.13,502.53 1010.43,510.83 1018.74,510.83 1026.54,518.62 1026.54,541.3 1020,547.84 v1(1020,550) ; v1(1070.96,549.04) 1070.96,551.21 1083.62,563.87 1083.62,588.07 U4.5
  Bottom Layer w10: v1(1020,550) 1070,550 v1(1070.96,549.04)
USB_DP: J3.3 U4.4 U5.3 U5.4 | length 373.7
  Top Layer w10: J3.3 1050,265.16 1045.16,270 1040.6,270 1040.6,310 1063.07,332.47 1063.07,353.07 U5.3 U5.4 1063.07,477.17 1063.07,502.53 1054.77,510.83 1048.39,510.83 1042.54,516.68 1042.54,548.91 1063.94,570.31 1063.94,576.26 1064.95,577.27 U4.4@1064.95,588.87
USB_VBUS_SENSE: R13.1 R14.2 U4.8 | length 147.8
  Top Layer w9.84: U4.8 1148.5,640.16 1168.27,659.92 1179.92,659.92 1193.5,673.5 R13.1
VIN_5V_RAW: J1.1 Q1.3 | length 199.5
  Top Layer w39.37: J1.1 Q1.3
VREF_AUDIO: R8.2 R10.1 U2.1 U2.2 | length 872.3
  Top Layer w9.84: R10.1 313.5,2958.5 320,2965 420,2965 ; v1(420,2991.08) 420,2965 ; v1(420,3040) 420,3118 463.5,3161.5 R8.2 ; U2.1 U2.2 615,2965 420,2965
  Bottom Layer w9.84: v1(420,2991.08) v1(420,3040)
pads on no net: J1.3 J3.4 U3.2 U3.3 U3.4 U3.5 U3.6 U3.14 U3.15 U3.16 U3.17 U3.18 U3.19 U3.20 U3.21 U3.22 U3.25 U3.26 U3.27 U3.28 U3.29 U3.32 U3.33 U3.34 U3.35 U3.36 U3.37 U3.38 U3.39 U3.40 U3.41 U3.45 U3.46 U4.1 U4.2 U4.10 U4.11 U4.14 U4.16 U4.19 U4.20

## Polygon pours and split planes (outlines as drawn)
GND on Top Layer "GND_TOP" (solid, remove dead copper, pour order 2): -55,-75 -55,3600 1470,3600 1470,-75
GND on Bottom Layer "GND_BOTTOM" (solid, remove dead copper, pour order 3): -55,-75 -55,3600 1470,3600 1470,-75

## Keep-outs
Keep-Out Layer:
  lines w10: -55,-75 337.5,-75 1072.5,-75 1470,-75 1470,3600 -30,3600 -55,3600 -55,2656.25 -55,868.75 -55,-75

## Silkscreen, mask and mechanical layers (free items; w line width, h text height)
Top Overlay:
  drawing of 9 lines, arcs and shapes, not listed
  text "SLEEVE" at 300,3443.43 h30
  text "GUITAR PREAMP" at 695,3300 h30
  text "TIP" at 300,3246.58 h30
  text "GAIN" at 100,2880 h30 r270
  text "+3.3V REG" at 735,2360 h30
  text "DSP AUDIO" at 350,2295 h30
  text "5V DC IN" at 305,2075 h30
  text "AMP MODULE" at 1290,1805 h30 r90
  text "AMP PWR" at 1010,1625 h30
  text "DSP PWR" at 835,1490 h30 r90
  text "BOOT" at 245,1345 h30
  text "DSP 5V OUT" at 1105,1305 h30 r90
  text "RESET" at 240,1110 h30
  text "DSP I2C" at 1315,1009.21 h30 r90
  text "FX" at 605,85 h30
  text "USB PROG / UART" at 1390,-35 h30 r90
Bottom Overlay:
  text "Portable Guitar MultiFX" at 1415,3510 h40
  text "ON: x1, OFF: x2" at 100,2595 h30 r270
  text "TO DSP" at 261.25,2342.27 h30 r90
  text "GND" at 360,2340 h30 r90
  text "GND" at 560,2340 h30 r90
  text "FROM DSP" at 460,2335 h30 r90
  text "AUDIO" at 1332.27,2078.75 h30
  text "GND" at 1325,1980 h30
  text "GND" at 1325,1875 h30
  text "+5V" at 1325,1780 h30
  text "CLOSED: ON" at 855,1725 h30 r90
  text "CLOSED: ON" at 1425,1685 h30
  text "+5V TSA" at 1339.56,1456.24 h30
  text "GND" at 1340,1370 h30
  text "SCA" at 1335.4,1188.6 h30
  text "SDA LINK" at 1040,1165 h30
  text "SCL" at 1325,1090 h30
  text "SCL LINK" at 1045,1010 h30
  text "GND" at 1336.06,988.75 h30
  text "OPEN JP4/JP5 FOR USBi" at 1445,840 h30
  text "CLEAN" at 190,30 h30
  text "J. Leon" at 1430,-35 h40
Board Shape:
  lines w10: -170,-20 -150,-80 ; -170,3535 -150,3595 ; -160,-80 -140,-80 ; -160,3595 -140,3595 ; -150,1476.59 -150,-80 ; -150,2038.41 -150,3595 ; -130,-20 -150,-80 ; -130,3535 -150,3595 ; -55,-75 -55,868.75 -55,2656.25 -55,3600 -30,3600 1470,3600 1470,-75 1072.5,-75 337.5,-75 -55,-75
  text "3675 (mil)" at -185.99,2028.41 h60 r270

## Dimensions
-55,3600 to 1470,3600 on Board Shape

## Text inside footprints (layer, text, board x,y; h text height)
D1: Top Overlay "+" at 322,188 h35
D2: Top Overlay "+" at 7,188 h35